# Altium PCB DC-Motor-Driver-v2.0.PcbDoc (part 5 of 5)
Units mil, origin at the board's own origin, x right, y up, seen from the top; angles counter-clockwise.
Board outline 3074 x 1810 mil, 4 copper layers (Top Layer, Signal 1, Signal 2, Bottom Layer), stack 62.055 mil thick; 232 components, 182 nets, 976 pads, 361 vias.
Unrouted connection lines stored in the file: 36.
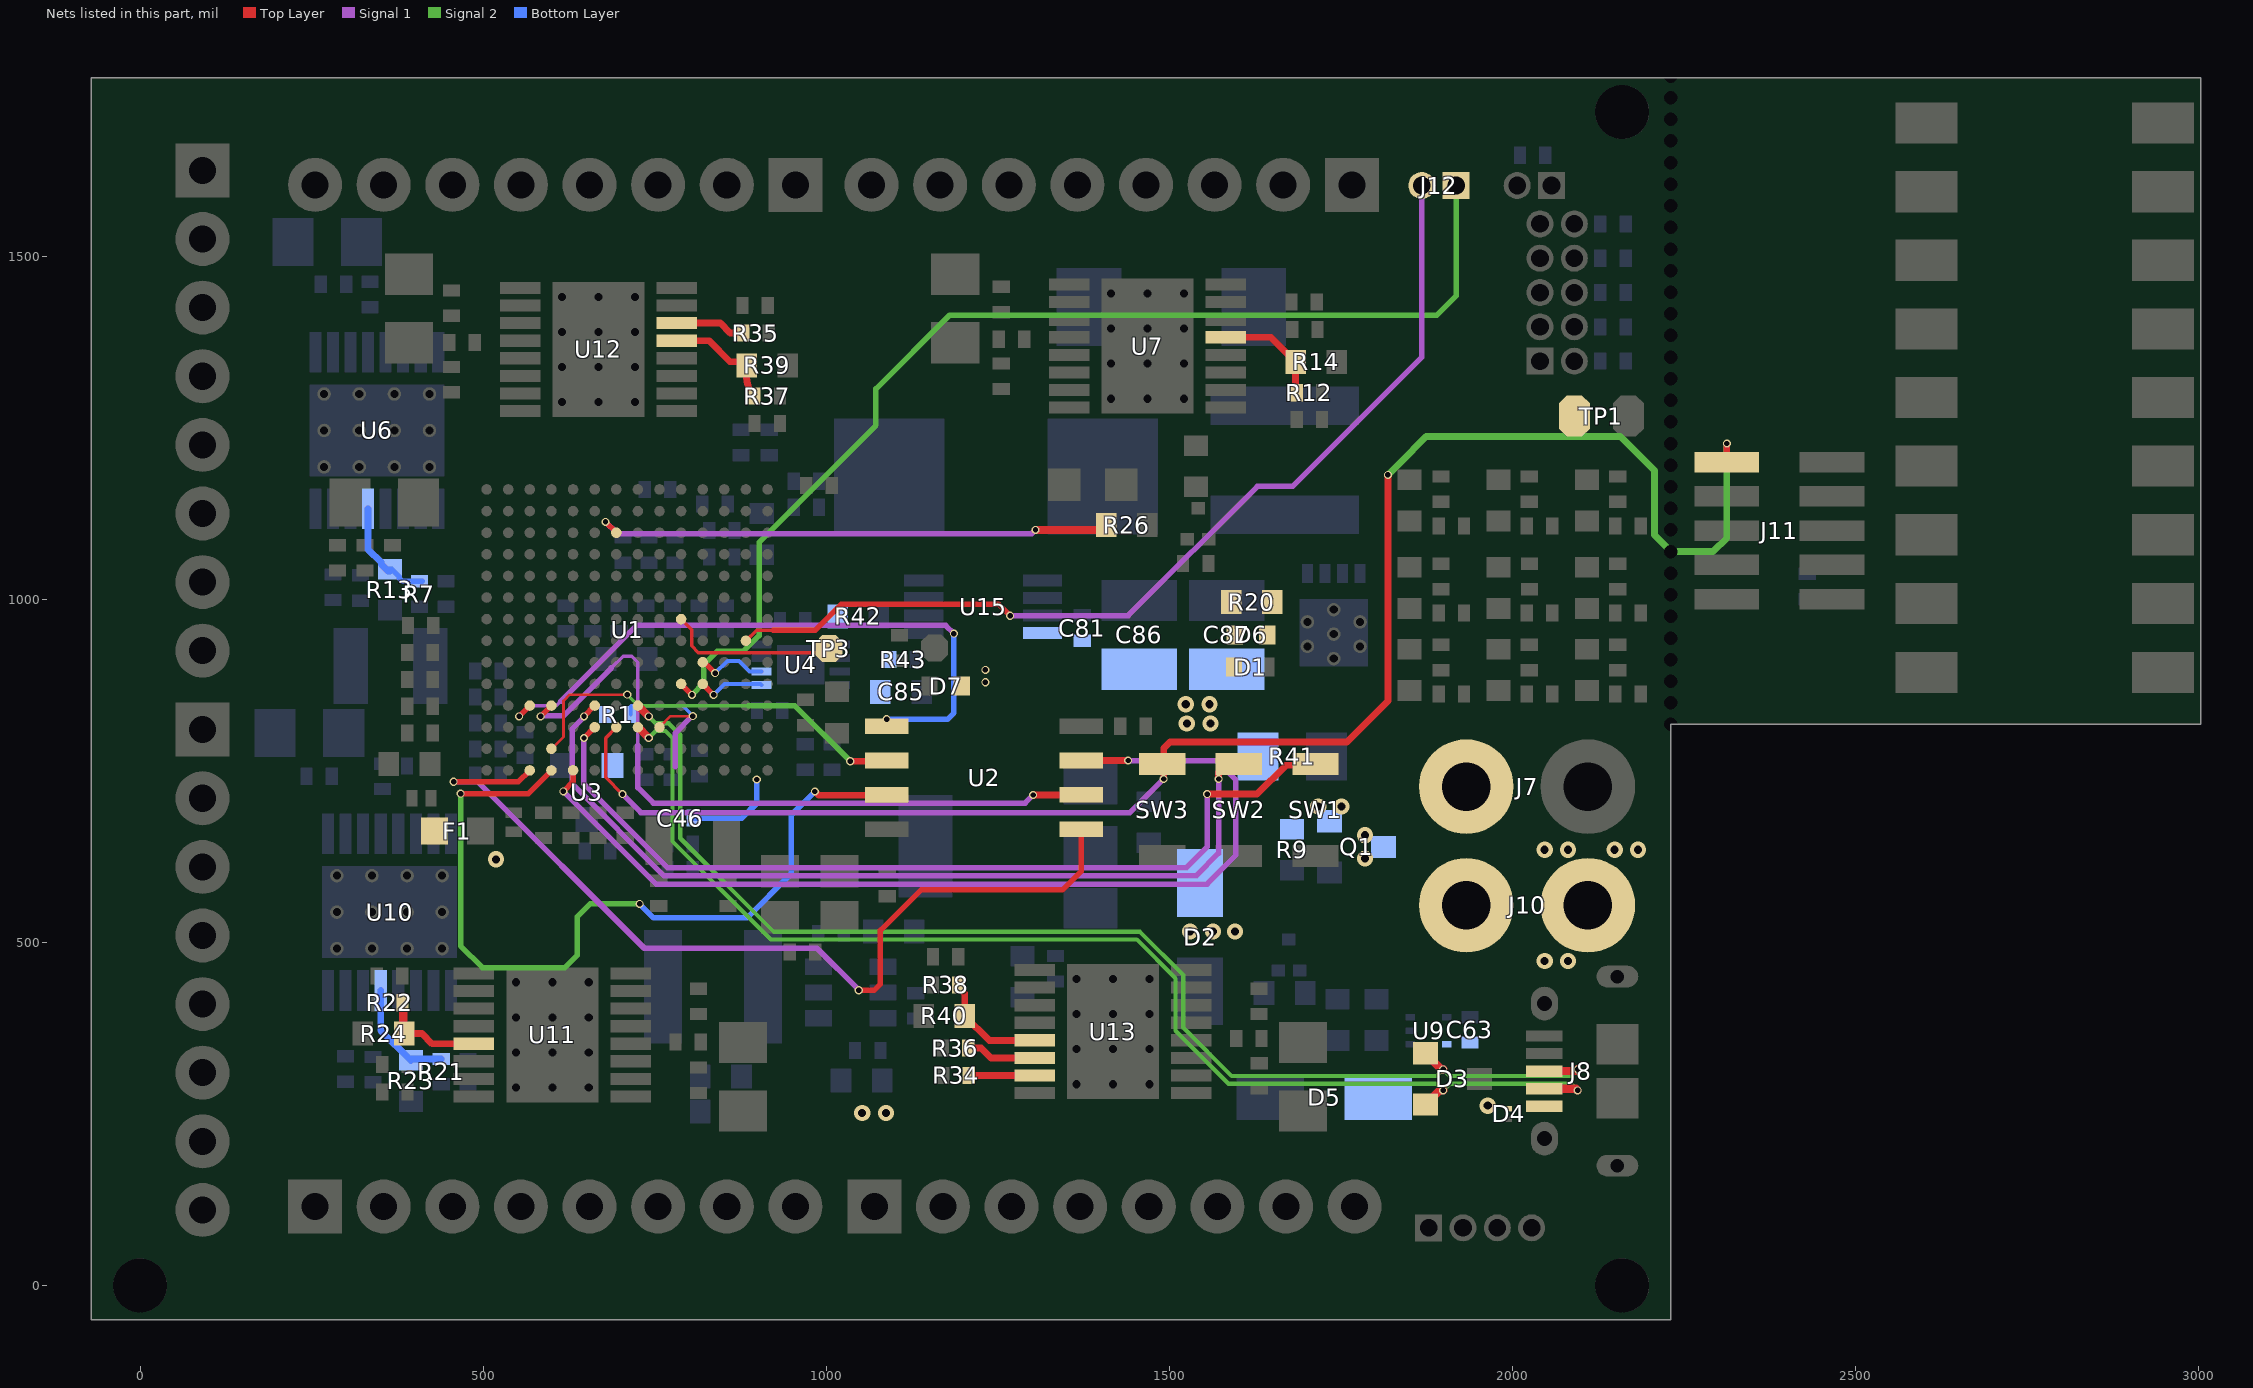
[diagram p5: the nets of this part, all layers, seen from the top]

## Via types
v1: diameter 23.62, hole 11.81, Top Layer to Bottom Layer, tented both sides, 182 vias
v2: diameter 11.81, hole 7.87, Top Layer to Bottom Layer, tented both sides, 179 vias

## Nets (pads, with @x,y where several pads share a name; then routed paths per layer and width w, separated by ;. In a path a pad name is that pad's centre, name@x,y a point inside that pad or via, vN(x,y) a via of type N, cw(c..) or ccw(c..) an arc to the next point about the centre after c; other vN are vias at no path point) (continued)
NetR34_1: R34.1 U13.7 | length 95.8
  Top Layer w10: R34.1@1207.8,306.02 U13.7@1303.63,306.02
NetR35_1: R35.1 U12.6 | length 102.8
  Top Layer w10: U12.6@782.17,1402.39 845.61,1402.39 860,1388 R35.1@879,1388
NetR36_1: R36.1 U13.6 | length 102.8
  Top Layer w10: R36.1@1206.8,346 1225.8,346 1240.19,331.61 U13.6@1303.63,331.61
NetTP3_1: TP3.1 U1.G10 | length 267.6
  Top Layer w5: U1.G10@788.47,971.06 804,955.53 804,932 813.76,922.24 1000.08,922.24 1000.08,927.24 1004,927.24 TP3.1@1017.04,927.24
NetU1_J11: U1.J11 U4.6 | length 106
  Top Layer w8: U1.J11@819.97,908.06 821.96,908.06 825.64,904.39 826.01,904.39 v2(838.13,892.27)
  Bottom Layer w6: v2(838.13,892.27) 855.86,910 873,910 888.34,894.66 U4.6@905.69,894.66
NetU1_K11: U1.K11 U4.5 | length 99.5
  Top Layer w8: U1.K11@820.04,876.5 v2(835.79,860.75)
  Bottom Layer w6: v2(835.79,860.75) 851.69,876.65 873.87,876.65 904,876.65 U4.5@905.69,874.97
NetU1_L3: U1.L3 U2.1 | length 943.4
  Top Layer w8: v2(552.32,829.25) U1.L3@568.07,845
  Top Layer w10: U2.1@1088,815 v2(1088,825.09)
  Signal 1 w5: v2(552.32,829.25) 567.73,844.66 606.29,844.66 613.31,851.69
  Signal 1 w8: 613.31,851.69 723.63,962 1174,962 v2(1186,950)
  Bottom Layer w8: v2(1088,825.09) 1176.59,825.09 1186,834.5 v2(1186,950)
NetU1_L4: U1.L4 U2.6 | length 1047.2
  Top Layer w8: v2(583.78,829.25) v2(583.78,829.25) 599.48,845 U1.L4@599.57,845
  Top Layer w10: v2(1301.5,714.69) 1301.66,714.84 U2.6@1371.86,714.84
  Signal 1 w5: 687,900 704,917 716.46,917 725.55,907.91 725.55,787.5
  Signal 1 w8: v2(583.78,829.25) 584.51,829.98 616.98,829.98 687,900 ; 725.55,787.5 725.55,725.5 748.05,703 1289.81,703 v2(1301.5,714.69)
NetU1_N4: U1.N4 U2.2 | length 593.1
  Top Layer w4: U1.N4@599.57,782.01 617,799.44 617,852 626,861 v2(710,861)
  Top Layer w10: v2(1035,763.94) U2.2@1088,763.94 ; U2.2@1072.29,764.29 U2.2@1073,765
  Signal 2 w5: v2(710,861) 726,845 886.5,845
  Signal 2 w8: 886.5,845 953.94,845 v2(1035,763.94)
NetU1_P3: U1.P3 U2.5 | length 1334.4
  Top Layer w8: v2@457.3,733.7 551.11,733.7 U1.P3@568,750.58 ; v2@1050.4,430.25 1055.75,430.25 1070.25,430.25 1079,439 1079,454.93 1079.04,454.97 1079.04,473.87 1079,473.9 1079,517.38 1138.62,577 1345,577 1371.86,603.86 U2.5@1371.86,665
  Signal 1 w8: v2(457,734) 492.15,734 734.77,491.38 986.27,491.38 v2(1047.4,430.25)
NetU1_P4: U1.P4 U2.3 | length 1210.9
  Top Layer w8: v2(467.17,716.79) 565.85,716.79 U1.P4@599.57,750.51
  Top Layer w10: v2(983.34,719.91) 983.83,719.91 989.4,714.34 U2.3@1088,714.34
  Signal 2 w8: v2(467.17,716.79) 467.17,494.83 499,463 619,463 637,481 637,537 656,556 v2(728,556)
  Bottom Layer w8: v2(728,556) 748.46,535.54 884.54,535.54 949,600 949,685.56 v2(983.34,719.91)
NetU1_P5: U1.P5 U2.7 | length 1451.5
  Top Layer w8: v2(616.91,720) 631.06,734.16 U1.P5@631.06,750.51
  Top Layer w10: U2.7@1356.86,765 v2(1440,765)
  Signal 1 w8: v2(616.91,720) 751.91,585 1555,585 1597,627 1597,736.91 1568.91,765 v2(1440,765)
ON/OFF: SW1.1 U1.M6 | length 1313.4
  Top Layer w8: v2(646.91,797.76) U1.M6@662.56,813.46
  Top Layer w10: v2(1555,716) 1628,716 1670,758 1711.07,758 SW1.1@1713,759.93
  Signal 1 w8: v2(646.91,797.76) 646.81,797.66 646.81,730.97 768.78,609 1525,609 1555,639 v2(1555,716)
POT1: J12.1 U1.K10 | length 1664
  Top Layer w8: U1.K10@788.54,876.5 v2(804.29,860.75)
  Signal 2 w8: v2(804.29,860.75) 821.22,877.68 821.22,904.18 841.42,924.38 879.38,924.38 902.03,947.03 902.03,1083.03 1072.5,1253.5 1072.5,1306.5 1180,1414 1890,1414 1918,1442 J12.1@1918,1603
POT2: J12.2 U1.H13 | length 1420.5
  Top Layer w5: U1.H13@883.03,939.49 898.54,955 923,955
  Top Layer w8: 923,955 984,955 1022,993 1250.87,993 v2(1267.87,976)
  Signal 1 w8: v2(1267.87,976) 1439.93,976 1628.3,1164.37 1679.63,1164.37 1868,1352.74 J12.2@1868,1603
RST_MCU: J11.10 pad.@2231,1069.5 R1.2 SW3.1 U1.M7 U3.2 | length 2478.4
  Top Layer w5: 678.41,797.76 678.41,740.59 v2(703,716) ; 678.41,797.8 U1.M7@694.06,813.45
  Top Layer w10: v2(1491.77,738.09) 1491.77,759.93 1491.77,782.77 1501,792 1759,792 1818.61,851.61 1818.61,1156.99 v2(1818.61,1181.28) ; J11.10@2312.46,1200 v2(2312.46,1226.98)
  Signal 1 w8: v2(703,716) 730,689 1442.46,689 1491.55,738.09 v2(1491.77,738.09)
  Signal 2 w10: v2(1818.61,1181.28) 1836.07,1198.74 1874.33,1237 2157.67,1237 2206.81,1187.86 2206.81,1093.69 pad.@2231,1069.5 2292.5,1069.5 2312.46,1089.46 v2(2312.46,1226.98)
TEST_LED: R26.1 U1.C7 | length 764.4
  Top Layer w8: v2(678.31,1112.72) U1.C7@693.98,1097.04 U1.C7@694.06,1096.97
  Top Layer w12: v2(1305,1101.09) 1400.91,1101.09 1401,1101 R26.1@1408,1108
  Signal 1 w8: v2(678.31,1112.72) 695.52,1095.5 1299.5,1095.5 1305,1101 v2(1305,1101.09)
USB_D_N: D3.2 J8.2 U1.M8 | length 1822
  Top Layer w12: U1.M8@725.48,813.57 v2(741.3,797.76) ; D3.2@1873.26,263.6 1893.93,284.26 v2(1899.05,284.26) ; J8.2@2046.7,286.78 2092.48,286.78 v2(2095,284.26)
  Signal 2 w6.27: v2(741.3,797.76) 751.41,807.87 765.8,807.87 776,797.67 776,647.06 915.76,507.3 919.06,504 1452.73,504 1509,447.73 1509,371.06 1512.3,367.76 1586.12,293.94 1889.38,293.94 v2(1899.05,284.26) 1908.73,293.94 2085.32,293.94 v2(2095,284.26)
USB_D_P: D3.1 J8.3 U1.L8 | length 1823.2
  Top Layer w12: U1.L8@725.48,845.07 v2(741.3,829.25) ; D3.1@1873.26,338.4 1896.78,314.89 v2(1899.05,314.89) ; J8.3@2046.7,312.37 2092.48,312.37 v2(2095,314.89)
  Signal 2 w6.27: v2(741.3,829.25) 751.41,819.14 770.46,819.14 787.27,802.33 787.27,651.73 923.73,515.27 1457.4,515.27 1520.27,452.4 1520.27,375.73 1590.79,305.21 1889.38,305.21 v2(1899.05,314.89) 1908.73,305.21 2085.32,305.21 v2(2095,314.89)
USB_VBUS: D4.2 D5.2 F1.1 J8.1
  other v1: 1052.36,251.44 1087,251.44 1964,262 518.78,621
V_BAT_BUCK: D2.2 Q1.3
  other v1: 1530.32,515.83 1563.66,515.83 1595.54,515.83 1785,622 1785,656
V_RTC: D6.1 R20.1 TP1.1
VBAT: C63.2 C81.2 C85.2 C86.2 C87.2 J10.2 Q1.2 R9.1 R41.2 R42.2 R43.2 U9.5 U15.8
  other v1: 2047,473 2081,473 2047,635 2081,635 2149,635 2183,635 1717,698 1751,698 1525.5,818.81 1560,818.81 1524,847 1558.5,847
VBAT_IN: J7.1 J10.1
VDD_SNVS: C46.2 D1.2 D6.2 D7.2 R1.1 R20.2 U1.M9 | length 386.2
  Top Layer w4: U1.M9@757.05,813.5 773.14,829.59 v2(805.46,829.59)
  Signal 1 w8: 780,756 780,805 804.59,829.59 v2(805.46,829.59)
  Bottom Layer w5: R1.1@715,832 715,844 716,845 790.93,845 805.46,830.47 v2(805.46,829.59)
  Bottom Layer w8: C46.2@805.58,681 877,681 898.71,702.71 v2(898.71,737.33)
  other v2: 1232,879 1232,897
VREF1: R7.1 R13.2 U6.5 | length 161.3
  Bottom Layer w8: R13.2@364,1044 366.5,1044 377.5,1033 377.5,1030.69 382.19,1026 R7.1@411,1026
  Bottom Layer w10: U6.5@332.2,1131.83 332.2,1072.8 351.5,1053.5 351.5,1051 361.5,1041 R13.2@364,1041
VREF2: R21.1 R23.2 U10.5 | length 165.3
  Bottom Layer w10: U10.5@350.7,429.83 350.7,371.8 R23.2@394.5,328 396.5,330 R21.1@439,330
VREF3: R37.1 R39.2 U12.5 | length 164.7
  Top Layer w10: U12.5@782.17,1376.8 829.2,1376.8 859.86,1346.14 878.86,1346.14 R39.2@884,1341 884,1323.76 ccw(c923.26,1323.76) R37.1@895.5,1296
VREF4: R12.1 R14.2 U7.5 | length 162.3
  Top Layer w10: U7.5@1582.17,1381.8 1648.2,1381.8 R14.2@1684,1346 1684,1302.5 R12.1@1685.5,1301
VREF5: R22.1 R24.2 U11.5 | length 153.9
  Top Layer w10: R24.2@384.8,367 411,367 425.8,352.2 U11.5@486.63,352.2
  Top Layer w12: R22.1@382.5,412 383.65,410.85 383.65,368.15 R24.2@384.8,367
VREF6: R38.1 R40.2 U13.5 | length 165.5
  Top Layer w10: R38.1@1192.5,438 1192.5,434.5 1201.8,425.2 R40.2@1201.8,393 1237.59,357.2 U13.5@1303.63,357.2
WAKE_UP: SW2.1 U1.L6 | length 1291.3
  Top Layer w8: v2(646.91,829.25) 646.91,829.37 U1.L6@662.54,845
  Top Layer w10: v2(1571.9,738.09) 1571.9,748 1583.83,759.93 SW2.1@1601.5,759.93
  Signal 1 w8: v2(646.91,829.25) 646.91,828.22 630,811.32 630,730.81 763.81,597 1539,597 1571.91,629.91 1571.91,736.33 v2(1571.9,738.09)
pads on no net: J1.4 J2.4 J3.4 J4.4 J5.4 J6.4 J8.4 J11.7 U1.A2 U1.A11 U1.A12 U1.A13 U1.B11 U1.B12 U1.B13 U1.B14 U1.C11 U1.C12 U1.C13 U1.C14 U1.D7 U1.D8 U1.D11 U1.D12 U1.D13 U1.D14 U1.E7 U1.E8 U1.E12 U1.G4 U1.G11 U1.G12 U1.H2 U1.H10 U1.H11 U1.H12 U1.H14 U1.J2 U1.J13 U1.J14 U1.K1 U1.L5 U1.L7 U1.L10 U1.L13 U1.M3 U1.M4 U1.M5 U1.M11 U1.M13 U1.M14 U1.N3 U1.N7 U1.N10 U1.N12 U1.N13 U1.P2 U1.P7 U1.P13 U9.3

## Polygon pours and split planes (outlines as drawn)
GND on Bottom Layer "GND_L04_P067" (solid, remove dead copper, pour order 67): -71,-50 -71,1760 2231,1760 3003,1760 3003,817 2231,817 2231,-50
NetC28_2 on Bottom Layer "NETC28_2_L04_P108" (solid, remove dead copper, pour order 108): 605.59,1018.59 605.59,976 866,976 866,1030 606,1030
VBAT on Bottom Layer "VBAT_L04_P048" (solid, remove dead copper, pour order 48): 1063.26,788 1040,810.67 1040,953 1000,953 1000,993 1055,993 1055,939 1104,939 1104,833 1308,833 1308,788
NetC85_1 on Bottom Layer "NETC85_1_L04_P047" (solid, remove dead copper, pour order 47): 1112,846 1173,846 1173,960 1112,960
3V3 on Bottom Layer "3V3_L04_P085" (solid, remove dead copper, pour order 85): 691.23,1045.5 850,1045.5 850,1114 818,1114 818,1077 691.23,1077 691.23,1076 691.23,1077 691.23,1076
VBAT on Bottom Layer "VBAT_L04_P041" (solid, remove dead copper, pour order 41): 1890,341 2221,341 2221,644 2020,644 2020,375 1890,375
BUCK_EN on Bottom Layer "BUCK_EN_L04_P042" (solid, remove dead copper, pour order 42): 1864.13,357.5 1830,357.5 1830,376 1717,376 1717,318 1864.13,318
NetQ2_1 on Bottom Layer "NETQ2_1_L04_P043" (solid, remove dead copper, pour order 43): 1680,475 1680,402 1771,402 1771,475 1681,475
NetQ1_1 on Bottom Layer "NETQ1_1_L04_P044" (solid, remove dead copper, pour order 44): 1653,491.14 1759,491.14 1759,621 1653,621
VBAT on Bottom Layer "VBAT_L04_P045" (solid, remove dead copper, pour order 45): 1765,656 1765,712 1659,712 1659,960 1281,960 1281,788 1583,788 1583,648 1765,648
NetQ4_5 on Bottom Layer "NETQ4_5_L04_P046" (solid, remove dead copper, pour order 46): 1684,721 1802,721 1802,1006 1684,1006
3V3_LDO on Bottom Layer "3V3_LDO_L04_P049" (solid, remove dead copper, pour order 49): 1332,730 1332,675 1498.07,675 1498.07,603 1330,603 1330,556 1100,556 1100,730
BUCKIN on Bottom Layer "BUCKIN_L04_P050" (solid, remove dead copper, pour order 50): 1254,460 1254,281 1189,281 1189,496 1346,496 1346,588.89 1502,588.89 1502,496 1598.17,496 1598.17,337 1711,337 1711,239 1573,239 1573,281 1504,281 1504,460
USB_VBUS on Bottom Layer "USB_VBUS_L04_P051" (solid, remove dead copper, pour order 51): 1745,234.87 1995,234.87 1995,312 1745,312
3V3_ENABLE on Bottom Layer "3V3_ENABLE_L04_P052" (solid, pour order 52): 1147.9,524.9 1147.9,414 1061,414 1061,440 1114,440 1114,545 1147.9,545
BUCKIN on Bottom Layer "BUCKIN_L04_P053" (solid, remove dead copper, pour order 53): 1064,400 1254,400 1254,280 1064,280 1064,320
NetD8_1 on Bottom Layer "NETD8_1_L04_P056" (solid, remove dead copper, pour order 56): 1322,1160 1322,1260 1484,1260 1484,1160 1777,1160 1777,1090 1761,1090 1761,1024 1689,1024 1689,1095 1322,1095
FB on Bottom Layer "FB_L04_P060" (solid, remove dead copper, pour order 60): 886,1145.5 886.5,1146 935,1146 935,1188 965,1188 965,1108 886,1108
6V on Bottom Layer "6V_L04_P062" (solid, remove dead copper, pour order 62): 1848,1480 1848,1252 1546,1252 1546,1480
6V on Bottom Layer "6V_L04_P063" (solid, remove dead copper, pour order 63): 2063,1570 2063,1252 1811,1252 1811,1570
MOTOR_1- on Bottom Layer "MOTOR_1-_L04_P072" (solid, remove dead copper, pour order 72): -66,1578 138,1578 138,1398 272,1398 272,1331 290,1331 290,1438 189,1438 189,1682 -66,1682
MOTOR_1+ on Bottom Layer "MOTOR_1+_L04_P073" (solid, remove dead copper, pour order 73): 262,873 -64,873 -64,971 193,971 193,1161 262,1161
MOTOR_2- on Bottom Layer "MOTOR_2-_L04_P074" (solid, remove dead copper, pour order 74): -64,861 -64,753 132,753 132,683 290,683 290,628 310.5,628 310.5,723 172,723 172,861 -62,861
MOTOR_2+ on Bottom Layer "MOTOR_2+_L04_P075" (solid, remove dead copper, pour order 75): 138,464 138,158 -68,158 -68,60 199,60 199,347 284,347 284,464
MOTOR_5- on Bottom Layer "MOTOR_5-_L04_P076" (solid, remove dead copper, pour order 76): 747,167 301,167 301,-44 205,-44 205,214 641,214 641,266 747,266
MOTOR_6- on Bottom Layer "MOTOR_6-_L04_P078" (solid, remove dead copper, pour order 78): 1564,172 1118,172 1118,-39 1022,-39 1022,219 1458,219 1458,271 1564,271
3V3 on Bottom Layer "3V3_L04_P084" (solid, remove dead copper, pour order 84): 505,657 476,628 444,628 444,688 505,688 505,963 392,963 392,1002.52 536,1002.52 536,779 574,779 574,706 574,657
3V3 on Bottom Layer "3V3_L04_P086" (solid, remove dead copper, pour order 86): 852.67,777 852.67,752 888,752 888,777 1024.46,777 1024.46,797.76 913,797.76 913,854 852.67,854
3V3 on Bottom Layer "3V3_L04_P089" (solid, remove dead copper, pour order 89): 1519,1559 1519,1757 2079,1757 2079,1583 2032,1583 2032,1673 1613,1673 1613,1559
NetC28_2 on Bottom Layer "NETC28_2_L04_P092" (solid, remove dead copper, pour order 92): 336,960 336,848 268,848 268,960
3V3 on Bottom Layer "3V3_L04_P093" (solid, remove dead copper, pour order 93): 585,1251 585,1389 425,1389 425,1331 521,1331 521,1251
3V3 on Bottom Layer "3V3_L04_P094" (solid, remove dead copper, pour order 94): 707.5,328 798,328 798,231 849,231 849,524.33 707.5,524.33
3V3 on Bottom Layer "3V3_L04_P104" (solid, remove dead copper, pour order 104): 824,576 713,576 713,555.14 743.81,524.33 824,524.33 824,497 707.5,497 635.5,569 635.5,697.91 667.5,697.91 667.5,596.91 792,596.91 792,666.5 852.67,666.5 852.67,778 920,778 920,639 824,639
MOTOR_1_F on Bottom Layer "NONET_L-01_P-001" (solid, remove dead copper, pour order 115): 426,1161 448,1161 448,1130 463,1115 463,1099 459,1095 426,1095
GND on Top Layer "GND_L01_P068" (solid, remove dead copper, pour order 68): -71.23,-50.58 -71.23,1759.42 2230.77,1759.42 3003,1759.42 3003,819 2230.77,819 2230.77,-50.58
3V3 on Top Layer "3V3_L01_P088" (solid, remove dead copper, pour order 88): 361,471 361,393 318,393 318,461 308,471 140,471 140,561 29,561 29,58 411,58 411,163 504,163 504,58 1228,58 1228,155 1318,155 1318,-40 -65,-40 -65,1757 1624,1757 1624,1559 1521,1559 1521,1668 799,1668 799,1559 710,1559 710,1670 16,1670 16,1474 146,1474 146,1381 16,1381 14,664 362,664 362,726 401.79,726 401.79,664 401.98,471
3V3 on Top Layer "3V3_L01_P111" (solid, remove dead copper, pour order 111): 921,1240 1291,1240 1291,1142 1387.49,1142 1387.49,1289 1319,1289 1319,1260 949,1260 949,1311 921,1311
6V on Top Layer "6V_L01_P103" (solid, remove dead copper, pour order 103): 1068,1463 1146,1463 1146,1428 1268,1428 1268,1367 1223,1367 1223,1347 1068,1347
V_RTC on Top Layer "V_RTC_L01_P058" (solid, remove dead copper, pour order 58): 1734,1165 1625,1165 1625,934 1628,931 1802,931 1802,1220 2123,1220 2123,1305 1734,1305
NetF1_2 on Top Layer "NETF1_2_L01_P069" (solid, remove dead copper, pour order 69): 562.5,670 516,670 516,686 471,686 471,641 562.5,641
3V3 on Top Layer "3V3_L01_P091" (solid, remove dead copper, pour order 91): 585,1236 521,1236 521,1284 585,1284
6V on Top Layer "6V_L01_P100" (solid, remove dead copper, pour order 100): 171,1397 303,1397 303,1425 470,1425 470,1357 422,1357 422,1332 171,1332
6V on Top Layer "6V_L01_P101" (solid, remove dead copper, pour order 101): 798.8,372 846.8,372 846.8,397 959,397 959,295 798.8,295
6V on Top Layer "6V_L01_P102" (solid, remove dead copper, pour order 102): 1613,309 1722,309 1722,404 1652,404 1652,375 1613,375 1613,373
MOTOR_2- on Top Layer "MOTOR_2-_L01_P105" (solid, remove dead copper, pour order 105): 300,686 302,686 244.86,686 244.86,753 35,753 35,860 316,860 316,686
3V3_LDO on Top Layer "3V3_LDO_L01_P114" (solid, remove dead copper, pour order 114): 1673,832 1619.62,832 1619.62,916 1673,916
VDD_SNVS on Top Layer "NONET_L-01_P-001" (solid, remove dead copper, pour order 116): 1186,889 1205,908 1606,908 1607,907 1607,868 1233,868 1213,848 1186,848
NetC28_2 on Top Layer "NETC28_2_L01_P083" (solid, pour order 83): 447,1064.9 445,1064.9 445,999 367,999 367,896 268,896 268,933 352.5,933 352.5,1012 407.5,1012 407.5,1064.9 368,1064.9 368,1065 271.92,1065 271.92,1095.5 368,1095.5 368,1176.5 447,1176.5
NetC24_2 on Top Layer "NETC24_2_L01_P054" (solid, remove dead copper, pour order 54): 408,697 446,697 446,836 548,836 548,857 446,857 446,901 408,901
NetC28_2 on Signal 1 "NETC28_2_L02_P112" (solid, remove dead copper, pour order 112): 268,896 268,1135.64 761,1135.64 761,983.51 300,983.51 300,896
6V on Signal 1 "6V_L02_P099" (solid, remove dead copper, pour order 99): -71,-50 -71,1760 2231,1760 3003,1760 3003,830 2231,830 2231,-50
VDD_SNVS on Signal 1 "VDD_SNVS_L02_P080" (solid, remove dead copper, pour order 80): 1247,931 1197,931 760,931 760,728 944.5,728 941.8,730.7 941.8,871 1247,871
VBAT on Signal 1 "VBAT_L02_P070" (solid, remove dead copper, pour order 70): 1506,858 1506,800 1675,800 1675,684 1815,684 1815,444 2225,444 2225,858
MOTOR_4- on Signal 1 "MOTOR_4-_L02_P064" (solid, remove dead copper, pour order 64): 1281,1475 1281,1558 1719,1558 1719,1729 1819,1729 1819,1475
MOTOR_5+ on Signal 1 "MOTOR_5+_L02_P077" (solid, remove dead copper, pour order 77): 946,251 1008,189 1008,-20 908,-20 908,163 413,163 413,251
MOTOR_6+ on Signal 1 "MOTOR_6+_L02_P079" (solid, remove dead copper, pour order 79): 1825,288 1825,62 1725,62 1725,168 1230,168 1230,288
MOTOR_3- on Signal 1 "MOTOR_3-_L02_P082" (solid, remove dead copper, pour order 82): 522,1470 522,1539 910,1539 910,1728 1003.5,1728 1003.5,1470
USB_VBUS on Signal 1 "USB_VBUS_L02_P096" (solid, remove dead copper, pour order 96): 1114,261 1114,231 1025,231 1025,371 500,371 500,650 569.94,650 761.94,458 1114,458
V_BAT_BUCK on Signal 1 "V_BAT_BUCK_L02_P066" (solid, pour order 66): 1498.07,557 1676,557 1676,677 1805,677 1805,496 1498.07,496
3V3 on Signal 2 "3V3_L03_P098" (solid, remove dead copper, pour order 98): -71,-50 -71,1760 2231,1760 3003,1760 3003,819 2231,819 2231,-50
NetQ4_5 on Signal 2 "NETQ4_5_L03_P071" (solid, remove dead copper, pour order 71): 1335,1066 1812,1066 1812,901 1393,901 1294,1000 1294,1066
MOTOR_4+ on Signal 2 "MOTOR_4+_L03_P065" (solid, remove dead copper, pour order 65): 1652,1531 1117,1531 1117,1712 1014,1712 1014,1470 1652,1470
MOTOR_3+ on Signal 2 "MOTOR_3+_L03_P081" (solid, remove dead copper, pour order 81): 852,1536 306,1536 306,1707 214,1707 214,1465 852,1465
MOTOR_2+ on Signal 2 "MOTOR_2+_L03_P107" (solid, remove dead copper, pour order 107): 42,159 42,57 205,57 205,318 266,318 266,466 145,466 145,158 43,158
MOTOR_1- on Signal 2 "MOTOR_1-_L03_P109" (solid, remove dead copper, pour order 109): 295,1454 295,1401 142,1401 142,1578 -28,1578 -28,1676 203,1676 203,1454 293,1454
3V3_LDO on Signal 2 "3V3_LDO_L03_P090" (solid, pour order 90): 1194,684 1581,684 1581,863.5 1686,863.5 1686,604 1194,604
USB_VBUS on Signal 2 "USB_VBUS_L03_P097" (solid, remove dead copper, pour order 97): 1015,395 1339,395 1339,274 1979,274 1979,162 1015,162

## Other copper
Top Layer:
  rectangle net GND: 2417.66,1031 2515,1116
  rectangle net GND: 1919.5,964.5 1943.5,992.5
  rectangle net GND: 1919.5,846.5 1943.5,874.5
  rectangle net GND: 2048,846.5 2072,874.5
  rectangle net 3: 2091,1156 2128,1191.5
  region net 3: 2111,1192.5 2111,1165.5 2194,1165.5 2194,1192.5
  rectangle net GPIO_B0_07: 2142,1094 2169,1156
  rectangle net GPIO_B0_07: 2142,1129 2194,1156
  rectangle net 3V3: 2091,1083.5 2128,1134.01
  rectangle net 2: 1961.5,1157 1998.5,1192.5
  region net 2: 1981.5,1192.5 1981.5,1165.5 2064.5,1165.5 2064.5,1192.5
  rectangle net GPIO_B0_06: 2012.5,1094 2039.5,1156
  rectangle net GPIO_B0_06: 2012.5,1129 2064.5,1156
  rectangle net 3V3: 1961.5,1083.5 1998.5,1134.01
  rectangle net 1: 1832,1157 1869,1192.5
  region net 1: 1852,1192.5 1852,1165.5 1935,1165.5 1935,1192.5
  rectangle net GPIO_B0_05: 1883,1094 1910,1156
  rectangle net GPIO_B0_05: 1883,1129 1935,1156
  rectangle net 3V3: 1832,1083.5 1869,1134.01
  rectangle net 6: 2091,1029.5 2128,1065
  region net 6: 2111,1065 2111,1038 2194,1038 2194,1065
  rectangle net GPIO_B0_14: 2142,966.5 2169,1028.5
  rectangle net GPIO_B0_14: 2142,1001.5 2194,1028.5
  rectangle net 3V3: 2091,956 2128,1006.51
  rectangle net 5: 1961.5,1029.5 1998.5,1065
  region net 5: 1981.5,1065 1981.5,1038 2064.5,1038 2064.5,1065
  rectangle net GPIO_B0_13: 2012.5,966.5 2039.5,1028.5
  rectangle net GPIO_B0_13: 2012.5,1001.5 2064.5,1028.5
  rectangle net 3V3: 1961.5,956 1998.5,1006.51
  rectangle net 4: 1832,1029.5 1869,1065
  region net 4: 1852,1065 1852,1038 1935,1038 1935,1065
  rectangle net GPIO_B0_12: 1883,966.5 1910,1028.5
  rectangle net GPIO_B0_12: 1883,1001.5 1935,1028.5
  rectangle net 3V3: 1832,956 1869,1006.51
  rectangle net 9: 2091,910 2128,945.5
  region net 9: 2111,945.5 2111,918.5 2194,918.5 2194,945.5
  rectangle net GPIO_AD_B0_05: 2142,847 2169,909
  rectangle net GPIO_AD_B0_05: 2142,882 2194,909
  rectangle net GND: 2177,846.5 2201,874.5
  rectangle net 3V3: 2091,836.5 2128,887.01
  rectangle net 8: 1961.5,910 1998.5,945.5
  region net 8: 1981.5,945.5 1981.5,918.5 2064.5,918.5 2064.5,945.5
  rectangle net GPIO_AD_B0_04: 2012.5,847 2039.5,909
  rectangle net GPIO_AD_B0_04: 2012.5,882 2064.5,909
  rectangle net 3V3: 1961.5,836.5 1998.5,887.01
  rectangle net 3V3: 1832,836.5 1869,887.01
  rectangle net GPIO_B0_15: 1883,882 1935,909
  rectangle net GPIO_B0_15: 1883,847 1910,909
  rectangle net 8: 1960.5,911 1997.5,946.5
  rectangle net MOTOR_3-: 480,1419 583,1437
  rectangle net MOTOR_3-: 480,1419 510,1495
  rectangle net MOTOR_3-: 480,1470 625,1508
  rectangle net NetC42_1: 735,580 776,685
  rectangle net 6V: 1239,1399 1383,1416
  region net 7: 1852,945.5 1852,918.5 1935,918.5 1935,945.5
  rectangle net 7: 1832,910 1869,945.5
  rectangle net 6V: 439,1394 583,1411
  rectangle net 3V3: 412,909 447,976
  rectangle net NetC39_1: 990,595 1103,630
  rectangle net NetC39_1: 990,580 1047,630
  rectangle net NetC44_2: 1058,849 1083,953
  region net 6V: 829.8,335 685.8,335 685.8,318 829.8,318
  region net MOTOR_5+: 515.8,285 422,285 422,221 515.8,221
  rectangle net 3V3: 1340,801 1426,829
  rectangle net 3V3: 1413,782 1441,829
  rectangle net NetC40_1: 885.5,469 961,561
  rectangle net MOTOR_4+: 1553,1449 1655,1513
  region net MOTOR_6-: 1605.8,264 1460.8,264 1460.8,226 1605.8,226
  region net MOTOR_6-: 1605.8,315 1575.8,315 1575.8,239 1605.8,239
  region net MOTOR_6-: 1605.8,315 1502.8,315 1502.8,297 1605.8,297
  rectangle net NetC43_1: 835,580 876,685
  rectangle net NetU1_P5: 1318,754 1403.5,778
  rectangle net USB_VBUS: 1961,253 2074,271
  rectangle net NetQ3_1: 1486,1038 1536,1096
  rectangle net NetQ3_1: 1452,1038 1496,1127
  rectangle net VDD_SNVS: 1570,884 1607,1018
  region net MOTOR_6+: 1332.8,290 1230.8,290 1230.8,226 1332.8,226
  region net MOTOR_5-: 788.8,310 685.8,310 685.8,292 788.8,292
  region net MOTOR_5-: 788.8,310 758.8,310 758.8,234 788.8,234
  region net MOTOR_5-: 788.8,259 643.8,259 643.8,219 788.8,219
  rectangle net MOTOR_4-: 1280,1424 1383,1442
  rectangle net MOTOR_4-: 1280,1424 1310,1500
  rectangle net MOTOR_4-: 1280,1475 1425,1513
  rectangle net NetLED1_2: 1403,1142 1454,1219
  rectangle net NetLED1_2: 1403,1206 1558,1240
  rectangle net NetQ3_3: 1521,1120 1557,1180
  region net 6V: 1646.8,340 1502.8,340 1502.8,323 1646.8,323
  rectangle net WAKE_UP: 1535.5,743 1635,777
  rectangle net USB_VBUS: 408,621 452,682
  region net USB_VBUS: 531,614 531,634 408,634 408,614
  rectangle net MOTOR_3+: 753,1444 855,1508
  rectangle net 6V: 345,1348 416,1425
  rectangle net MOTOR_1+: 194,1054 232,1165
  region net NetC44_2: 967,888 953.54,874.54 953.54,846.46 962,838 1163,838 1163,888
Bottom Layer:
  rectangle net GPIO_B0_13: 2219.71,1091 2241.29,1111
  rectangle net FSR5: 2070,1525 2139,1569
  rectangle net GND: 1623,407 1669,461.04
  rectangle net NetC28_2: 634,895 693,932
  rectangle net RST_MCU: 690.7,707.09 710,779
  rectangle net RST_MCU: 662.56,738 696,846
  rectangle net GND: 1982,1583 2027,1665
  rectangle net NetC58_1: 1016.83,416 1034,533
  rectangle net NetC58_1: 884,413 1034,440
  rectangle net 3V3: 917.8,952.98 942,984
  rectangle net NetC7_2: 799.39,767 828.39,786
  region net 6V: 316.5,773 316.5,629 333.5,629 333.5,773
  rectangle net 6V: 270,727 332,755
  region net 6V: 270,840 270,744 370.5,744 370.5,840
  rectangle net GND: 268,973 335,1009
  rectangle net NetC58_2: 968,453 1008,533
  rectangle net VDD_SNVS: 705,815.55 725.55,847.5
  region net 6V: 298,1475 298,1331 315,1331 315,1475
  region net 6V: 283,1556 283,1446 353,1446 353,1556
  rectangle net FSR3: 2070,1425 2139,1467
  rectangle net V_BAT_BUCK: 1512,504 1617,635
  rectangle net 6V: 978,1112 1002,1184
  rectangle net FSR1: 2070,1325 2139,1367
  rectangle net VBAT_IN: 1859,479 2007,804
  rectangle net 3V3: 1044,449 1105,485
  rectangle net FSR2: 2070,1375 2139,1417
  rectangle net V_BAT_BUCK: 1772,607 1831,674
  region net MOTOR_1-: 272,1434 272,1331 290,1331 290,1434
  region net MOTOR_1-: 192,1434 192,1404 290,1404 290,1434
  rectangle net FSR4: 2070,1474 2139,1518
  rectangle net NetQ4_5: 1286,1018 1353,1045

## Silkscreen, mask and mechanical layers (free items; w line width, h text height)
Top Overlay:
  lines w5: 312,746 314,748 341,748 ; 318,809 322,805 377.08,805 ; 333,957 337,953 352,953 364,965 378,965 ; 1949,1485 1985,1485 1985,1643
  text "3V3" at 2078.24,1587.8 h30
  text "MOTOR 3" at 206,1507.4 h65
  text "MOTOR 4" at 1007,1507.4 h65
  text "&" at 1245,1472.08 h35
  text "&" at 444,1466.58 h35
  text "&" at 1282,1335.58 h35
  text "&" at 479,1332.58 h35
  text "FUSE BIT SETTINGS" at 2534.2,1308.5 h50 r90
  text "PROGRAMING" at 2268.75,1264.41 h40
  text "~" at 1740,1238.82 h45
  text "~" at 948.79,1231.86 h45
  text "HEADER" at 2268.75,1229.41 h40
  text "V_RTC" at 2062.72,1223.3 h30 r90
  text "GND" at 2227.46,1223.3 h30 r90
  text "*" at 1917,1206.04 h45 r180
  text "*" at 2045.5,1206.04 h45 r180
  text "*" at 2174.5,1206.04 h45 r180
  text "~" at 1025.5,1142.82 h45
  text "~" at 1950.18,1129 h45 r90
  text "~" at 2078.68,1129 h45 r90
  text "~" at 2207.68,1129 h45 r90
  text "*" at 1917,1078.54 h45 r180
  text "*" at 2046,1078.54 h45 r180
  text "*" at 2174.5,1078.54 h45 r180
  text "^" at 1843.5,1070.93 h35
  text "^" at 1973,1070.93 h35
  text "^" at 2102.5,1070.93 h35
  text "~" at 1950.18,1002 h45 r90
  text "~" at 2078.68,1002 h45 r90
  text "~" at 2206.68,1001 h45 r90
  text "#" at 278,998.43 h40
  text "#" at 320,998.43 h40
  text "#" at 361,998.43 h40
  text "*" at 1917,960.54 h45 r180
  text "*" at 2045.5,960.54 h45 r180
  text "*" at 2174.5,960.54 h45 r180
  text "~" at 1099.54,952.82 h45
  text "^" at 1843.5,943.43 h35
  text "^" at 1973,943.43 h35
  text "^" at 2102.5,943.43 h35
  text "#" at 350,910.43 h40
  text "~" at 1950.18,884 h45 r90
  text "~" at 2078.68,884 h45 r90
  text "~" at 2207.68,884 h45 r90
  text "#" at 350,872.93 h40
  text "MOTOR 1" at 191.6,871 h65 r90
  text "#" at 350,835.43 h40
  text "^" at 1843.5,823.93 h35
  text "^" at 1973,823.93 h35
  text "^" at 2102.5,823.93 h35
  text "&" at 1484,803.08 h35
  text "#" at 960,771.43 h40
  text "GND" at 2228.8,645.86 h50 r90
  text "#" at 676.5,631.07 h40 r180
  text "ON/OFF" at 1660.21,569.52 h30
  text "RST" at 1439,569.44 h30
  text "WAKE UP" at 1551,560.15 h30
  text "~" at 1148,487.32 h45
  text "VBAT_IN" at 1851.45,473 h50 r90
  text "VBAT" at 2228.8,472.86 h50 r90
  text "~" at 307,445.82 h45
  text "&" at 1586,315.08 h35
  text "&" at 769,311.08 h35
  text "&" at 1620,250.08 h35
  text "&" at 804,239.08 h35
  text "MOTOR 5" at 200,158.4 h65
  text "MOTOR 6" at 1015,158.4 h65
  text "MOTOR 2" at 191.6,56 h65 r90
Bottom Overlay:
  drawing of 57 lines, arcs and shapes, not listed
  text "&" at 2057.5,1666.58 h35
  text "M3+" at 227.4,1644 h65 r270
  text "Z" at 327.4,1644.16 h55 r270
  text "B" at 427.4,1644.16 h55 r270
  text "A" at 527.4,1644.16 h55 r270
  text "3V3" at 727.4,1644.16 h55 r270
  text "GND" at 827.4,1644.16 h55 r270
  text "M3-" at 927.4,1644 h65 r270
  text "M4+" at 1037.4,1644 h65 r270
  text "Z" at 1137.4,1644.16 h55 r270
  text "B" at 1237.4,1644.16 h55 r270
  text "A" at 1337.4,1644.16 h55 r270
  text "3V3" at 1537.4,1644.16 h55 r270
  text "GND" at 1637.4,1644.16 h55 r270
  text "M4-" at 1737.4,1644 h65 r270
  text "POT2" at 1846.74,1629.16 h50 r270
  text "POT1" at 1896.74,1629.16 h50 r270
  text "M1-" at 47,1597.4 h65
  text "GND" at 47,1497.4 h55
  text "&" at 245,1447.08 h35
  text "&" at 315,1410.08 h35
  text "3V3" at 47,1397.4 h55
  text "@" at 2150.2,1291.53 h40
  text "~" at 888,1253.32 h45
  text "~" at 928,1253.32 h45
  text "@" at 1947,1241.53 h40
  text "6V" at 2016.74,1226.06 h50 r270
  text "FSR" at 2068.74,1226.06 h50 r270
  text "A" at 47,1197.4 h55
  text "~" at 717.48,1157.57 h45
  text "~" at 829,1148.82 h45
  text "&" at 714,1105.58 h35
  text "&" at 751.89,1105.58 h35
  text "&" at 789.77,1105.58 h35
  text "B" at 47,1097.4 h55
  text "~" at 962,1094.82 h45
  text "~" at 456,1030.82 h45
  text "&" at 900,1007.58 h35
  text "#" at 667.63,1006.22 h35
  text "#" at 705.69,1006.22 h35
  text "#" at 744.02,1006.22 h35
  text "#" at 783,1006.38 h35
  text "#" at 821.41,1006.22 h35
  text "#" at 860.11,1006.22 h35
  text "Z" at 47,997.4 h55
  text "&" at 937.03,988.56 h35
  text "&" at 2441,958.58 h35
  text "M1+" at 47,897.4 h65
  text "&" at 470,845.75 h35
  text "&" at 880.5,826.08 h35
  text "#" at 839.29,785.37 h40 r180
  text "M2-" at 47,782.4 h65
  text "&" at 470,769.97 h35
  text "#" at 959.46,731.57 h40 r180
  text "&" at 224,731.08 h35
  text "#" at 726.5,718.07 h40 r180
  text "&" at 331.5,715.08 h35
  text "#" at 500.5,695.43 h40
  text "GND" at 47,682.4 h55
  text "#" at 845,675.93 h40
  text "#" at 845,638.43 h40
  text "&" at 723,622.08 h35
  text "3V3" at 47,582.4 h55
  text "&" at 998,534.58 h35
  text "&" at 1346,402.08 h35
  text "A" at 47,382.4 h55
  text "~" at 488,335.82 h45
  text "&" at 1112,330.08 h35
  text "Note:" at 2229,326.15 h45
  text "& >>100nF 0402" at 2226,291 h45
  text "B" at 47,282.4 h55
  text "# >>0.22uF 0402" at 2226,253 h45
  text "~ >>10K  0402" at 2226,215 h45
  text "Z" at 47,182.4 h55
  text "* >>DNP  0402" at 2226.36,176.4 h45
  text "^ >>1K  0603" at 2226.21,138.22 h45
  text "M2+" at 47,82.4 h65
  text "Z" at 882.6,71 h55 r90
  text "Z" at 1697.6,71 h55 r90
  text "3V3" at 1857.4,-41 h55 r270
  text "TX" at 1907.4,-41 h55 r270
  text "RX" at 1957.4,-41 h55 r270
  text "GND" at 2007.74,-41.28 h50 r270
  text "M5-" at 227.4,-43.16 h65 r270
  text "GND" at 327.4,-43 h55 r270
  text "3V3" at 427.4,-43 h55 r270
  text "A" at 627.4,-43 h55 r270
  text "B" at 727.4,-43 h55 r270
  text "M5+" at 927.4,-43.16 h65 r270
  text "M6-" at 1042.4,-43.16 h65 r270
  text "GND" at 1142.4,-43 h55 r270
  text "3V3" at 1242.4,-43 h55 r270
  text "A" at 1442.4,-43 h55 r270
  text "B" at 1542.4,-43 h55 r270
  text "M6+" at 1742.4,-43.16 h65 r270
Board_Outline:
  lines w10: -71,-50 -71,1760 2231,1760 3003,1760 3003,817.54 2231,817.54 2231,-50 -71,-50
Fabrication:
  drawing of 295 lines, arcs and shapes, not listed
  text "Layer" at 3435.09,1123.99 h60
  text "Name" at 3845,1123.99 h60
  text "Material" at 4774.74,1123.99 h60
  text "Thickness" at 5634.51,1123.99 h60
  text "Constant" at 6284.35,1123.99 h60
  text "Board Layer Stack" at 6854.21,1123.99 h60
  text "Top Overlay" at 3845,1003.99 h60
  text "Top Solder" at 3845,883.99 h60
  text "Solder Resist" at 4774.74,883.99 h60
  text "0.50mil" at 5634.51,883.99 h60
  text "3.5" at 6284.35,883.99 h60
  text "1" at 3435.09,763.99 h60
  text "Top Layer" at 3845,763.99 h60
  text "1.18mil" at 5634.51,763.99 h60
  text "Dielectric 2" at 3845,643.99 h60
  text "PP-006" at 4774.74,643.99 h60
  text "8.28mil" at 5634.51,643.99 h60
  text "4.1" at 6284.35,643.99 h60
  text "2" at 3435.09,523.99 h60
  text "Signal 1" at 3845,523.99 h60
  text "CF-004" at 4774.74,523.99 h60
  text "0.60mil" at 5634.51,523.99 h60
  text "Dielectric 1" at 3845,403.99 h60
  text "FR-4" at 4774.74,403.99 h60
  text "41.93mil" at 5634.51,403.99 h60
  text "4.8" at 6284.35,403.99 h60
  text "3" at 3435.09,283.99 h60
  text "Signal 2" at 3845,283.99 h60
  text "CF-004" at 4774.74,283.99 h60
  text "0.60mil" at 5634.51,283.99 h60
  text "Dielectric 3" at 3845,163.99 h60
  text "PP-006" at 4774.74,163.99 h60
  text "8.28mil" at 5634.51,163.99 h60
  text "4.1" at 6284.35,163.99 h60
  text "4" at 3435.09,43.99 h60
  text "Bottom Layer" at 3845,43.99 h60
  text "1.18mil" at 5634.51,43.99 h60
  text "Bottom Solder" at 3845,-76.01 h60
  text "Solder Resist" at 4774.74,-76.01 h60
  text "0.50mil" at 5634.51,-76.01 h60
  text "3.5" at 6284.35,-76.01 h60
  text "Bottom Overlay" at 3845,-196.01 h60
  text "Total board thickness:" at 3435.09,-316.01 h60
  text "63.06mil" at 5634.51,-316.01 h60
Drill Drawing:
  circle w10: c3484.5,3178.33 r20
  circle w10: c3484.5,3178.33 r33.33
  circle w10: c3484.5,2878.33 r33.33
  lines w10: 3451.17,1961.67 3467.83,1961.67 3484.5,1945 3501.17,1961.67 3517.83,1961.67 3501.17,1978.33 3517.83,1995 3501.17,1995 3484.5,2011.67 3467.83,1995 3451.17,1995 3467.83,1978.33 3451.17,1961.67 ; 3451.17,2095 3517.83,2095 3517.83,2161.67 3451.17,2161.67 3451.17,2095 ; 3451.17,2245 3517.83,2245 3517.83,2311.67 3451.17,2311.67 3451.17,2245 ; 3451.17,2411.67 3467.83,2411.67 3467.83,2395 3501.17,2395 3501.17,2411.67 3517.83,2411.67 3517.83,2445 3501.17,2445 3501.17,2461.67 3467.83,2461.67 3467.83,2445 3451.17,2445 3451.17,2411.67 ; 3451.17,2545 3451.17,2561.67 3467.83,2578.33 3451.17,2595 3451.17,2611.67 3467.83,2611.67 3484.5,2595 3501.17,2611.67 3517.83,2611.67 3517.83,2595 3501.17,2578.33 3517.83,2561.67 3517.83,2545 3501.17,2545 3484.5,2561.67 3467.83,2545 3451.17,2545 ; 3451.17,2761.67 3517.83,2761.67 3484.5,2695 3451.17,2761.67 ; 3451.17,3061.67 3517.83,3061.67 3484.5,2995 3451.17,3061.67 ; 3451.17,3295 3484.5,3311.67 3517.83,3295 3501.17,3328.33 3517.83,3361.67 3484.5,3345 3451.17,3361.67 3467.83,3328.33 3451.17,3295 ; 3451.17,3478.33 3484.5,3445 3517.83,3478.33 3484.5,3511.67 3451.17,3478.33 ; 3464.5,2258.33 3504.5,2258.33 3504.5,2298.33 3464.5,2298.33 3464.5,2258.33 ; 3464.5,3048.33 3504.5,3048.33 3484.5,3008.33 3464.5,3048.33
  lines w15: 3391.37,1900 13358.59,1900 ; 3391.37,3550 13358.59,3550 ; 3942.25,1750 3942.25,3700 ; 4542.09,1750 4542.09,3700 ; 5641.77,1750 5641.77,3700 ; 6147.65,1750 6147.65,3700 ; 6881.45,1750 6881.45,3700 ; 8381,1750 8381,3700 ; 8970.85,1750 8970.85,3700 ; 9716.65,1750 9716.65,3700 ; 10856.31,1750 10856.31,3700 ; 11955.99,1750 11955.99,3700 ; 3391.37,1750 13358.59,1750 13358.59,3700 3391.37,3700 3391.37,1750
  text "Symbol" at 3481.37,3595 h72
  text "Count" at 3987.25,3595 h72
  text "Hole Size" at 4587.09,3595 h72
  text "Plated" at 5686.77,3595 h72
  text "Hole Type" at 6192.65,3595 h72
  text "Drill Layer Pair" at 6926.45,3595 h72
  text "Via/Pad" at 8426,3595 h72
  text "Pad Shape" at 9015.85,3595 h72
  text "Template" at 9761.65,3595 h72
  text "Hole Length" at 10901.31,3595 h72
  text "Routed Path Length" at 12000.99,3595 h72
  text "179" at 3987.25,3445 h60
  text "7.87mil (0.200mm)" at 4587.09,3445 h60
  text "PTH" at 5686.77,3445 h60
  text "Round" at 6192.65,3445 h60
  text "Top Layer - Bottom Layer" at 6926.45,3445 h60
  text "Via" at 8426,3445 h60
  text "Rounded" at 9015.85,3445 h60
  text "v30h20m0mx0" at 9761.65,3445 h60
  text "-" at 10901.31,3445 h60
  text "-" at 12000.99,3445 h60
  text "261" at 3987.25,3295 h60
  text "11.81mil (0.300mm)" at 4587.09,3295 h60
  text "PTH" at 5686.77,3295 h60
  text "Round" at 6192.65,3295 h60
  text "Top Layer - Bottom Layer" at 6926.45,3295 h60
  text "(Mixed)" at 8426,3295 h60
  text "Rounded" at 9015.85,3295 h60
  text "(Mixed)" at 9761.65,3295 h60
  text "-" at 10901.31,3295 h60
  text "-" at 12000.99,3295 h60
  text "3" at 3987.25,3145 h60
  text "19.69mil (0.500mm)" at 4587.09,3145 h60
  text "NPTH" at 5686.77,3145 h60
  text "Round" at 6192.65,3145 h60
  text "Top Layer - Bottom Layer" at 6926.45,3145 h60
  text "Pad" at 8426,3145 h60
  text "Rounded" at 9015.85,3145 h60
  text "c0hn50" at 9761.65,3145 h60
  text "-" at 10901.31,3145 h60
  text "-" at 12000.99,3145 h60
  text "28" at 3987.25,2995 h60
  text "19.69mil (0.500mm)" at 4587.09,2995 h60
  text "PTH" at 5686.77,2995 h60
  text "Round" at 6192.65,2995 h60
  text "Top Layer - Bottom Layer" at 6926.45,2995 h60
  text "Pad" at 8426,2995 h60
  text "Rounded" at 9015.85,2995 h60
  text "c0h50" at 9761.65,2995 h60
  text "-" at 10901.31,2995 h60
  text "-" at 12000.99,2995 h60
  text "2" at 3987.25,2845 h60
  text "19.69mil (0.500mm)" at 4587.09,2845 h60
  text "PTH" at 5686.77,2845 h60
  text "Slot" at 6192.65,2845 h60
  text "Top Layer - Bottom Layer" at 6926.45,2845 h60
  text "Pad" at 8426,2845 h60
  text "Rounded" at 9015.85,2845 h60
  text "r80_155h50_115r100" at 9761.65,2845 h60
  text "45.28mil (1.150mm)" at 10901.31,2845 h60
  text "25.59mil (0.650mm)" at 12000.99,2845 h60
  text "2" at 3987.25,2695 h60
  text "21.65mil (0.550mm)" at 4587.09,2695 h60
  text "PTH" at 5686.77,2695 h60
  text "Slot" at 6192.65,2695 h60
  text "Top Layer - Bottom Layer" at 6926.45,2695 h60
  text "Pad" at 8426,2695 h60
  text "Rounded" at 9015.85,2695 h60
  text "r100_125h55_85r100" at 9761.65,2695 h60
  text "33.47mil (0.850mm)" at 10901.31,2695 h60
  text "11.81mil (0.300mm)" at 12000.99,2695 h60
  text "14" at 3987.25,2545 h60
  text "25.59mil (0.650mm)" at 4587.09,2545 h60
  text "PTH" at 5686.77,2545 h60
  text "Round" at 6192.65,2545 h60
  text "Top Layer - Bottom Layer" at 6926.45,2545 h60
  text "Pad" at 8426,2545 h60
  text "(Mixed)" at 9015.85,2545 h60
  text "(Mixed)" at 9761.65,2545 h60
  text "-" at 10901.31,2545 h60
  text "-" at 12000.99,2545 h60
  text "4" at 3987.25,2395 h60
  text "25.59mil (0.650mm)" at 4587.09,2395 h60
  text "PTH" at 5686.77,2395 h60
  text "Round" at 6192.65,2395 h60
  text "Top Layer - Bottom Layer" at 6926.45,2395 h60
  text "Pad" at 8426,2395 h60
  text "(Mixed)" at 9015.85,2395 h60
  text "(Mixed)" at 9761.65,2395 h60
  text "-" at 10901.31,2395 h60
  text "-" at 12000.99,2395 h60
  text "48" at 3987.25,2245 h60
  text "39.37mil (1.000mm)" at 4587.09,2245 h60
  text "PTH" at 5686.77,2245 h60
  text "Round" at 6192.65,2245 h60
  text "Top Layer - Bottom Layer" at 6926.45,2245 h60
  text "Pad" at 8426,2245 h60
  text "(Mixed)" at 9015.85,2245 h60
  text "(Mixed)" at 9761.65,2245 h60
  text "-" at 10901.31,2245 h60
  text "-" at 12000.99,2245 h60
  text "4" at 3987.25,2095 h60
  text "70.87mil (1.800mm)" at 4587.09,2095 h60
  text "PTH" at 5686.77,2095 h60
  text "Round" at 6192.65,2095 h60
  text "Top Layer - Bottom Layer" at 6926.45,2095 h60
  text "Pad" at 8426,2095 h60
  text "Rounded" at 9015.85,2095 h60
  text "c350h180" at 9761.65,2095 h60
  text "-" at 10901.31,2095 h60
  text "-" at 12000.99,2095 h60
  text "3" at 3987.25,1945 h60
  text "78.74mil (2.000mm)" at 4587.09,1945 h60
  text "NPTH" at 5686.77,1945 h60
  text "Round" at 6192.65,1945 h60
  text "Top Layer - Bottom Layer" at 6926.45,1945 h60
  text "Pad" at 8426,1945 h60
  text "Rounded" at 9015.85,1945 h60
  text "c200hn200" at 9761.65,1945 h60
  text "-" at 10901.31,1945 h60
  text "-" at 12000.99,1945 h60
  text "548 Total" at 3987.25,1795 h60
  text "Slot definitions :" at 3481.37,1650.03 h60
  text "Routed Path Length" at 4514.06,1650.03 h60
  text "= Calculated from tool start centre position to tool end centre position." at 5616.73,1650.03 h60
  text "Hole Length" at 4514.06,1550.05 h60
  text "= Routed Path Length + Tool Size = Slot length as defined in the PCB layout" at 5206.86,1550.05 h60

## Dimensions
3003,817.54 to 3003,1760 on Dimension
3003,1760 to 2231,1762.42 on Dimension
-71,1760 to 2231,1760 on Dimension
-71,-50 to -71,1760 on Dimension

## Text inside footprints (layer, text, board x,y; h text height)
C50: Bottom Overlay "+" at 381.03,1508.5 h25
C51: Top Overlay "+" at 1200.5,1315.48 h25 r90
C65: Bottom Overlay "+" at 355.02,792.5 h25
C66: Top Overlay "+" at 866.4,412.27 h25 r270
C73: Top Overlay "+" at 404.5,1315.48 h25 r90
C74: Top Overlay "+" at 1682.5,412.27 h25 r270
J1: Mechanical 13 "PCB Edge" at -36.54,1387.55 h31.5 r270
J2: Mechanical 13 "PCB Edge" at -36.54,572.55 h31.5 r270
J3: Mechanical 13 "PCB Edge" at 717.55,1731.54 h31.5 r180
J4: Mechanical 13 "PCB Edge" at 1528.55,1731.54 h31.5 r180
J5: Mechanical 13 "PCB Edge" at 492.45,-12.54 h31.5
J6: Mechanical 13 "PCB Edge" at 1307.45,-12.54 h31.5
J8: Top Overlay "PCB Edge" at 2214.67,248.24 h31.5 r90
SW4: Top Overlay "ON" at 2802.5,1095.43 h19.47; Top Overlay "ON" at 2802.5,1295.43 h19.47; Top Overlay "ON" at 2802.5,1395.43 h19.47; Top Overlay "ON" at 2802.5,1495.43 h19.47; Top Overlay "ON" at 2802.5,1595.43 h19.47; Top Overlay "ON" at 2802.5,1695.43 h19.47; Top Overlay "ON" at 2802.5,1195.43 h19.47; Top Overlay "ON" at 2802.5,995.43 h19.47; Top Overlay "ON" at 2802.5,894.63 h19.47